# Altium PCB EFI.PcbDoc (part 2 of 3)
Units mm, origin at the board's own origin, x right, y up, seen from the top; angles counter-clockwise.
Board outline 100.1 x 100.83 mm, 2 copper layers (Top Layer, Bottom Layer), stack 1.57 mm thick; 101 components, 85 nets, 326 pads, 97 vias.
Unrouted connection lines stored in the file: 58.
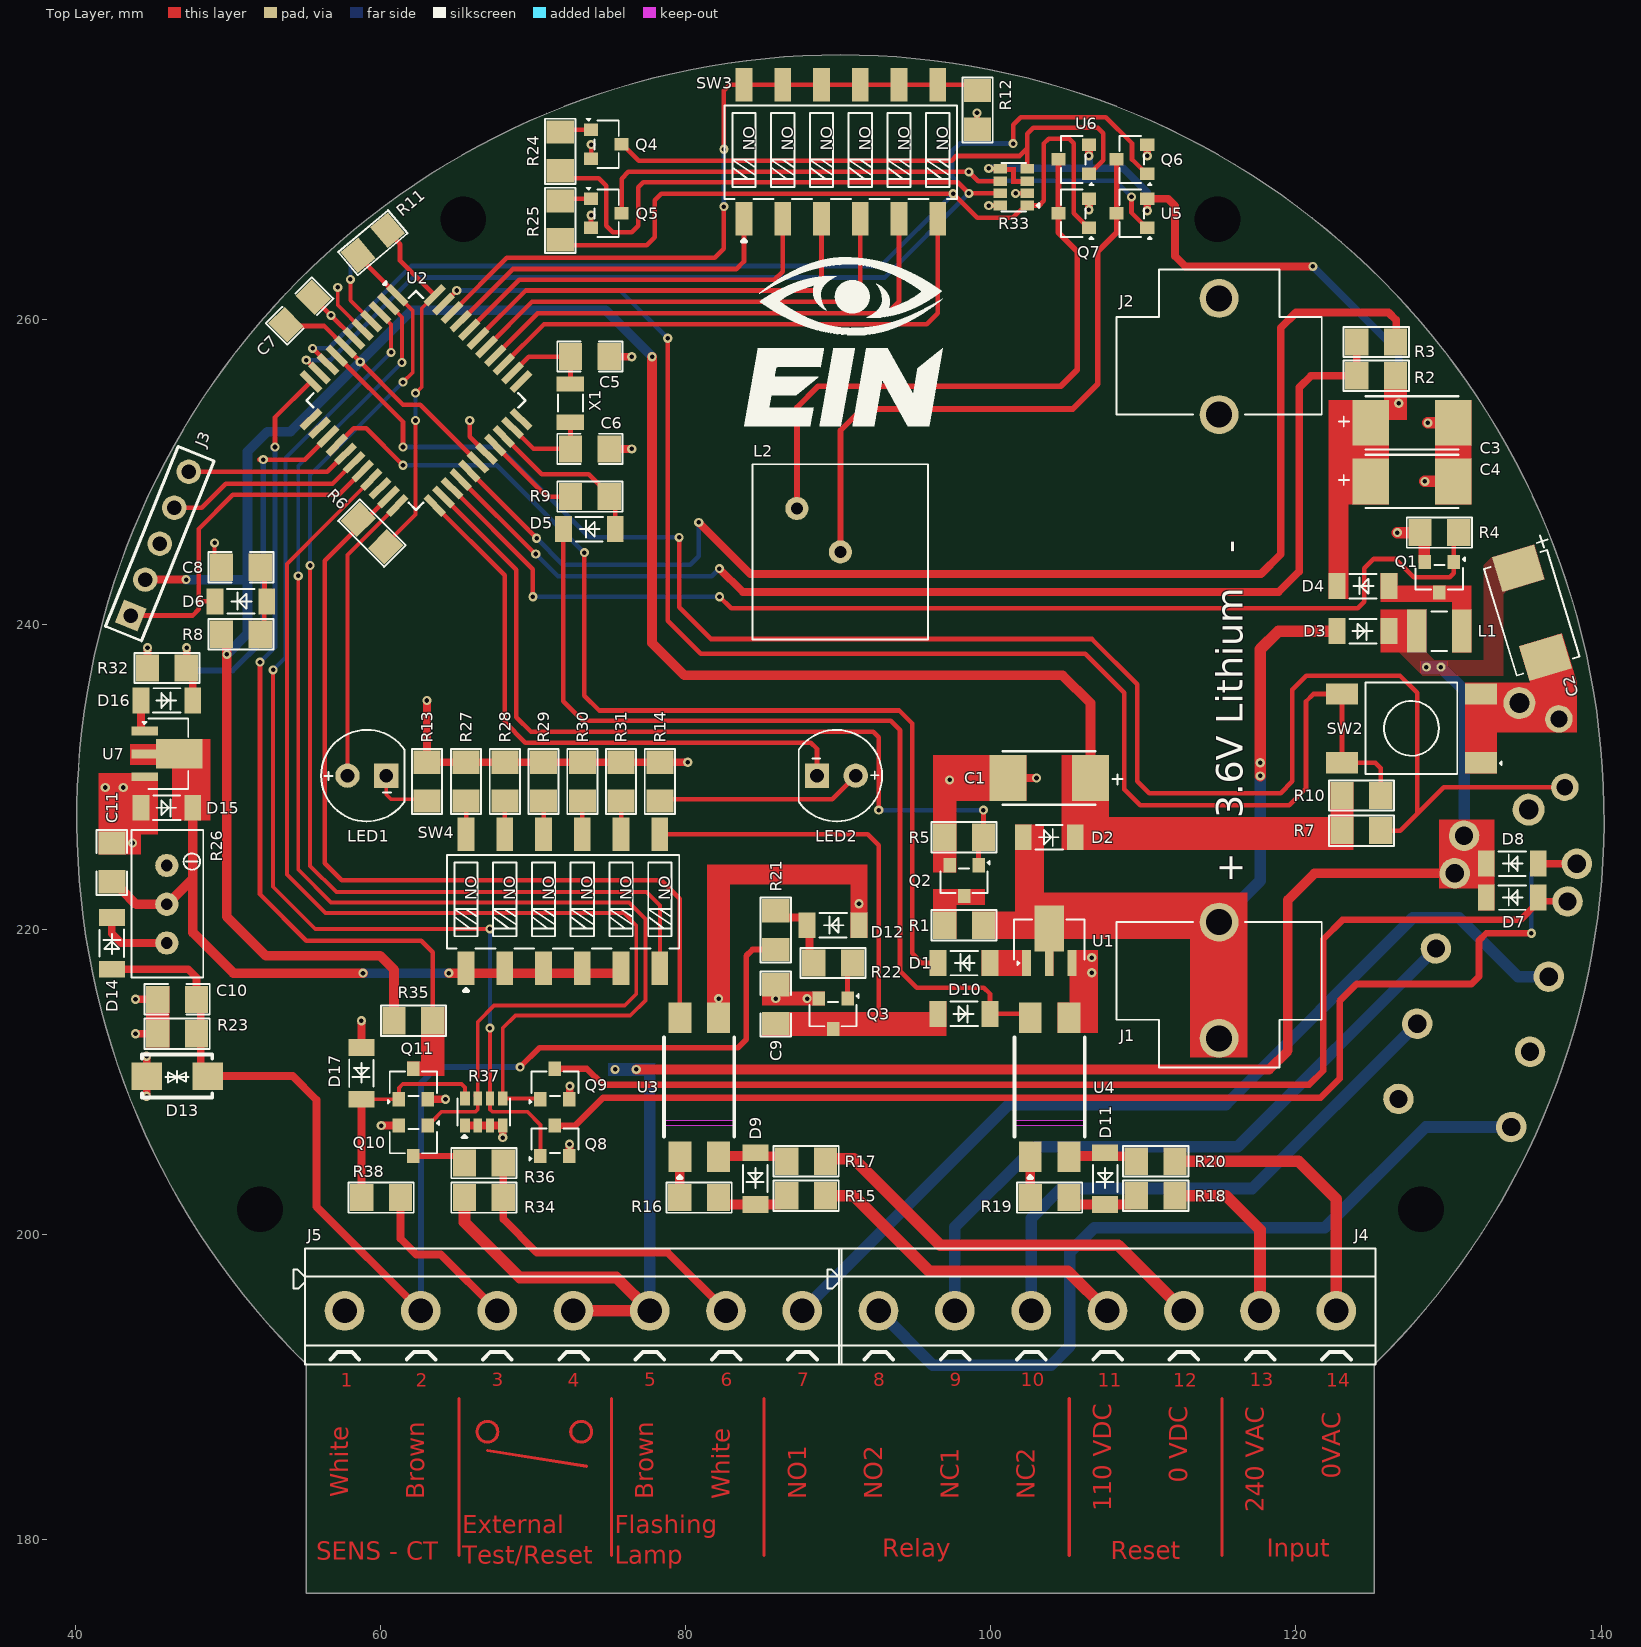
[diagram p0: Top Layer view]

## Part data (continued)
SW3 SW4: "6 digits 24V Black 25mA 3000 Times SMD DIP Switches ROHS", LCSC Part Number=C5439765, Manufacturer="SM Switch", Package=SMD, ComponentLink1Description=LCSC, ComponentLink1URL=https://www.lcsc.com/product-detail/DIP-Switches_SM-Switch-SMXS-06K-TP_C5439765.html, Item Type="DIP SWITCH", Manufacturer Part Number=SMXS-06K-TP
TP1: "Wire Connecting Pad", Item Type="Test Point", Manufacturer Part Number="2 Test Pad"
TP2: "Test Point ON", Item Type="TEST POINT"
U1 U7: "Supervisory Circuits", LCSC Part Number=-, Manufacturer=Torex, Package=SOT-89, ComponentLink1Description=Torex, Item Type=IC
  U1: ComponentLink1URL=https://direct.torexsemi.com/en-us/product/xc61c/xc61cc2502pr-g, Manufacturer Part Number=XC61CC2502PR-G
  U7: ComponentLink1URL=https://direct.torexsemi.com/en-us/product/xc61c/xc61cc3002pr-g, Manufacturer Part Number=XC61CC3002PR-G
U2: "IC MCU 8BIT 14KB FLASH 44TQFP", LCSC Part Number=C31511, Manufacturer=Microchip, Access Time=20us, ComponentLink1Description=https://datasheet.ciiva.com/6149/41291f-6149840.pdf?src-supplier=Farnell, ComponentLink1URL=https://datasheet.ciiva.com/6149/41291f-6149840.pdf?src-supplier=Farnell, ComponentLink2Description=https://datasheet.ciiva.com/29119/160450-da-01-en-pic-pic16f887-i-pt-29119396.pdf?src-supplier=Conrad, ComponentLink2URL=https://datasheet.ciiva.com/29119/160450-da-01-en-pic-pic16f887-i-pt-29119396.pdf?src-supplier=Conrad, ComponentLink3Description=https://datasheet.ciiva.com/1489/41291g-1489550.pdf?src-supplier=Digikey, ComponentLink3URL=https://datasheet.ciiva.com/1489/41291g-1489550.pdf?src-supplier=Digikey, ComponentLink4Description=https://datasheet.ciiva.com/3203/41291f-3203503.pdf?src-supplier=Avnet, ComponentLink4URL=https://datasheet.ciiva.com/3203/41291f-3203503.pdf?src-supplier=Avnet, ComponentLink5Description=https://datasheet.ciiva.com/16211/filehandler-aspxddocname-en027084-16211484.pdf?src-supplier=Future+Electronics, ComponentLink5URL=https://datasheet.ciiva.com/16211/filehandler-aspxddocname-en027084-16211484.pdf?src-supplier=Future+Electronics, ComponentLink6Description=https://datasheet.ciiva.com/7892/41291f-7892232.pdf?src-supplier=Element14, ComponentLink6URL=https://datasheet.ciiva.com/7892/41291f-7892232.pdf?src-supplier=Element14, ComponentLink7Description=https://datasheet.ciiva.com/7892/1681365-7892233.pdf?src-supplier=Element14, ComponentLink7URL=https://datasheet.ciiva.com/7892/1681365-7892233.pdf?src-supplier=Element14, Item Type=IC, Lead Free=5697LeadFree, Manufacturer Part Number=PIC16F887-I/PT, Pricing="1=2.91 (USD)", RoHS=Yes, Stock=46, Supplier="Arrow Electronics"
U3 U4: "OPTOISOLATOR 5.3KV TRANS 4SMD", LCSC Part Number=C5156027, Manufacturer=Vishay, Item Type=IC, Manufacturer Part Number=SFH6156-2, Pricing="1=0.56, 10=0.37, 50=0.37, 100=0.253, 1000=0.218, 10000=0.217 (USD)", RoHS=No, Stock=11480, Supplier=Mouser
U5 U6: "MOSFET P-CH 20V 4.2A SOT23-3", LCSC Part Number=C85097, Manufacturer="Diodes Zetex", ComponentLink1Description=https://datasheet.ciiva.com/13059/ds31737-52560-13059868.pdf?src-supplier=Mouser, ComponentLink1URL=https://datasheet.ciiva.com/13059/ds31737-52560-13059868.pdf?src-supplier=Mouser, ComponentLink2Description=https://datasheet.ciiva.com/11176/ds31737-11176455.pdf?src-supplier=Avnet, ComponentLink2URL=https://datasheet.ciiva.com/11176/ds31737-11176455.pdf?src-supplier=Avnet, Item Type=MOSFETs, Manufacturer Part Number=DMP2305U-7, Pricing="3000=0.0412, 9000=0.0402, 15000=0.0398, 45000=0.0388, 75000=0.038 (USD)", RoHS=Yes, Stock=207000, Supplier="Future Electronics"
X1: "32.768kHz Surface Mount Crystal 12.5pF ±20ppm SMD3215-2P Crystals ROHS", LCSC Part Number=C32346, Manufacturer=Epson, ComponentLink1Description=https://datasheet.octopart.com/Q13FC13500004-Epson-datasheet-62043850.pdf?src-supplier=Farnell, ComponentLink1URL=https://datasheet.octopart.com/Q13FC13500004-Epson-datasheet-62043850.pdf?src-supplier=Farnell, ComponentLink2Description=https://datasheet.octopart.com/Q13FC13500004-Epson-datasheet-32025749.pdf?src-supplier=Newark, ComponentLink2URL=https://datasheet.octopart.com/Q13FC13500004-Epson-datasheet-32025749.pdf?src-supplier=Newark, Item Type=Crystals, Manufacturer Part Number=Q13FC13500004, Reach SVHC Compliant=4187SVHC, RoHS=Yes, Stock=52665, Supplier=Farnell

## Free pads (board coordinates)
  round 0 hole 3 unplated: MH(52.095,201.651) MH(65.43,266.548) MH(114.859,266.548) MH(128.194,201.651)

## Via types
v1: diameter 0.6, hole 0.3, Top Layer to Bottom Layer, 97 vias

## Nets (pads, with @x,y where several pads share a name; then routed paths per layer and width w, separated by ;. In a path a pad name is that pad's centre, name@x,y a point inside that pad or via, vN(x,y) a via of type N, cw(c..) or ccw(c..) an arc to the next point about the centre after c; other vN are vias at no path point)
AUTO_RST: R11.2 SW4.6 U2.1 | length 72.6
  Top Layer w0.254: v1(55.386,243.847) 55.386,224.16 57.109,222.437 77.432,222.437 78.309,221.56 SW4.6@78.309,217.438 ; U2.1@61.093,261.557 62.117,260.533 62.117,256.512 v1(61.476,255.87)
  Top Layer w0.305: R11.2@58.864,264.458 58.864,263.786 U2.1@61.093,261.557
  Bottom Layer w0.254: v1(55.386,243.847) 55.386,249.78 v1(61.476,255.87)
AUTO_RST_CT: C9.2 D10.2 Q3.3 SW4.7 | length 27.6
  Top Layer w0.305: SW4.7@78.309,226.238 91.927,226.238 92.655,225.51 92.655,214.438 92.013,213.796 91.056,213.796
BATT_CNT_RST: R10.1 SW2.2 U2.43 | length 103.1
  Top Layer w0.305: U2.43@64.122,260.991 v1(65.001,261.87) ; v1(78.829,258.737) 78.829,240.225 80.993,238.061 106.197,238.061 108.75,235.508 108.75,229.17 109.79,228.13 119.556,228.13 120.66,229.234 120.66,234.935 121.147,235.422 SW2.2@123.022,235.422 SW2.2@123.022,230.922 125.212,230.922 125.562,230.571 R10.1@125.562,228.778
  Bottom Layer w0.305: v1(65.001,261.87) 75.696,261.87 v1(78.829,258.737)
BATT_LED: LED1.2 U2.22 | length 19.1
  Top Layer w0.254: LED1.2@57.836,230.073 57.836,244.523 U2.22@61.093,247.78
BATT_LOAD: Q2.1 R5.2 U2.24 | length 56.1
  Top Layer w0.305: U2.24@64.122,248.345 68.907,243.561 68.907,233.904 69.864,232.947 92.292,232.947 92.655,232.584 v1(92.655,227.816) ; Q2.1@99.197,224.199 99.197,225.715 R5.2@99.517,226.035 v1(99.517,227.816)
  Bottom Layer w0.305: v1(92.655,227.816) v1(99.517,227.816)
BATT_LOW_SNS: D1.1 U2.15 | length 68.7
  Top Layer w0.305: U2.15@57.133,251.74 58.235,252.841 59.055,252.841 v1(61.476,250.42) ; v1(73.36,244.692) 73.36,235.324 74.341,234.343 93.992,234.343 94.843,233.492 94.843,218.424 95.477,217.79 D1.1@96.547,217.79
  Bottom Layer w0.305: v1(61.476,250.42) 67.632,250.42 v1(73.36,244.692)
BLINK_LAMP: Q10.1 R37.7 U2.19 | length 77.4
  Top Layer w0.254: U2.19@59.396,249.477 56.764,246.845 53.861,243.942 53.861,223.589 56.386,221.064 75.96,221.064 76.763,220.262 76.763,215.751 76.01,214.998 67.437,214.998 66.372,213.934 66.372,209.23 66.26,209.117 R37.7@66.238,209.117 ; Q10.1@63.104,207.137 63.104,207.187 63.387,207.47 63.437,207.47 64.009,208.042 66.223,208.042 66.372,208.191 R37.7@66.372,208.907
BLINK_LAMP_O: J5.2 R34.1 R36.1 | length 20.9
  Top Layer w0.508: R34.1@68.042,202.289 R36.1@68.042,204.677 ; R34.1@68.042,202.416 68.042,201.021 70.252,198.811 78.824,198.811 J5.2@82.645,194.991
BOOST_FB1: R2.1 R3.2 U2.26 | length 77.3
  Top Layer w0.305: U2.26@65.254,249.477 65.273,249.477 70.151,244.599 v1(70.17,244.599)
  Top Layer w0.508: v1(82.207,243.644) 83.736,242.116 118.875,242.116 120.218,243.459 120.218,255.511 120.991,256.284 R2.1@123.993,256.284 R3.2@123.993,258.496
  Bottom Layer w0.305: v1(70.17,244.599) 71.633,243.136 81.699,243.136 v1(82.207,243.644)
BOOST_FB2: R3.1 U2.27 | length 84.5
  Top Layer w0.305: U2.27@65.819,250.043 v1(70.231,245.631)
  Top Layer w0.508: v1(80.861,246.669) 84.242,243.288 117.71,243.288 118.999,244.577 118.999,259.424 120.002,260.426 126.07,260.426 126.566,259.93 R3.1@126.566,258.529
  Bottom Layer w0.305: v1(70.231,245.631) 71.958,243.903 80.303,243.903 80.861,244.461 v1(80.861,246.669)
BOOST_PWR: Q1.1 R4.2 U2.25 | length 76
  Top Layer w0.305: U2.25@64.688,248.911 69.99,243.609 v1(69.99,241.795) ; v1(82.218,241.795) 82.98,241.033 124.04,241.033 124.483,241.476 124.483,243.665 125.093,244.275 126.517,244.275 127.719,243.073 130.084,243.073 130.347,243.336 130.347,245.679 R4.2@130.667,245.999
  Bottom Layer w0.305: v1(69.99,241.795) v1(82.218,241.795)
CONFIG_SW_COM: R12.2 SW3.7 SW3.8 SW3.9 SW3.10 SW3.11 SW3.12 U2.42 | length 46.9
  Top Layer w0.305: U2.42@64.688,260.426 68.27,264.008 81.909,264.008 82.504,264.603 v1(82.504,267.373) ; v1(82.504,271.132) 82.504,274.976 82.89,275.361 SW3.12@83.82,275.361 SW3.11@86.36,275.361 SW3.10@88.9,275.361 SW3.9@91.44,275.361 SW3.8@93.98,275.361 SW3.7@96.52,275.361 98.755,275.361 R12.2@99.136,274.98
  Bottom Layer w0.305: v1(82.504,267.373) v1(82.504,271.132)
CT_IN: C10.2 D13.2 D14.2 J5.6 R21.2 R23.2 | length 82
  Top Layer w0.381: v1(69.149,210.971) 70.42,212.242 83.439,212.242 83.972,212.776 83.972,218.262 84.389,218.679 R21.2@85.903,218.679
  Top Layer w0.508: D14.2@42.39,217.381 47.394,217.381 47.944,216.831 C10.2@47.944,215.413 48.226,215.131 48.226,213.153 48.226,210.832 D13.2@48.674,210.384 54.243,210.384 55.8,208.827 55.8,201.835 J5.6@62.645,194.991
  Bottom Layer w0.381: J5.6@62.645,194.991 62.645,209.92 63.696,210.971 v1(69.149,210.971)
CT_RB4: D16.1 R32.1 U2.14 | length 27.6
  Top Layer w0.305: v1@52.059,250.789 52.064,250.785 55.047,250.785 U2.14@56.567,252.305
  Top Layer w0.508: v1(47.295,238.452) 47.295,237.16 R32.1@47.269,237.134 47.699,236.704 D16.1@47.699,235.001
  Bottom Layer w0.381: v1(47.295,238.452) 47.295,237.527 47.86,236.961 50.307,236.961 52.313,238.968 v1(52.313,250.789)
EXT_RST_I: Q11.3 R35.1 U2.11 | length 52.4
  Top Layer w0.305: v1(52.103,237.515) 52.103,222.294 55.145,219.252 62.666,219.252 63.424,218.494 R35.1@63.424,214.008 ; v1(53.086,251.613) 53.086,253.55 U2.11@55.436,255.9
  Bottom Layer w0.305: v1(52.103,237.515) 53.086,238.498 53.086,251.358 52.911,251.533 v1@52.911,251.613
EXT_RST_IN: D17.1 Q11.1 R37.8 R38.1 | length 14.9
  Top Layer w0.254: D17.1@58.75,208.864 Q11.1@61.204,208.864 61.204,209.61 61.458,209.864 65.306,209.864 65.532,209.637 R37.8@65.532,208.907
  Top Layer w0.508: D17.1@58.75,208.864 58.75,202.442 R38.1@58.777,202.416
GND: C1.2 C2.2 C3.2 C4.2 C5.1 C6.1 C7.1 C8.1 C9.1 C10.1 C11.1 D12.2 D13.1 D15.2 D17.2 J2.1 J3.3 J5.7 Q1.2 Q2.2 Q3.2 Q4.2 Q5.2 Q6.2 Q7.2 Q8.2 Q9.2 Q10.2 Q11.2 R4.1 R5.1 R12.1 R13.1 R14.1 R23.1 R26.1 R27.2 R28.2 R29.2 R30.2 R31.2 R32.2 R33.2 R33.8 R37.1 R37.2 R37.3 R37.4 SW1.1 SW1.SH1 SW1.SH2 SW2.1 TP2.1 U1.3 U2.6 U2.29 U3.3 U4.3 U7.3 | length 75.3
  Top Layer w0.254: v1(49.124,245.325) 49.124,244.192 C8.1@49.581,243.735
  Top Layer w0.305: C7.1@55.723,261.603 55.723,261.27 v1(56.753,260.24) U2.6@58.265,258.729 ; v1(65.849,253.35) 65.849,252.276 U2.29@66.951,251.174 ; v1(73.8,266.802) 73.8,265.982 Q5.2@73.803,265.979 ; Q4.2@73.803,270.5 v1(73.803,271.436) ; v1(99.862,267.439) R33.8@100.623,267.439 ; v1(101.627,268.239) R33.2@102.393,268.239
  Top Layer w0.381: v1(99.095,273.507) 99.095,272.482 R12.1@99.136,272.44
  Top Layer w0.508: C11.1@42.39,225.657 v1(43.747,225.657) ; v1(43.942,213.153) R23.1@45.404,213.153 ; v1(43.942,215.413) C10.1@45.404,215.413 ; 44.297,226.721 D15.2@44.297,227.969 ; v1(44.674,209.059) D13.1@44.674,210.384 v1(44.674,211.679) ; R32.2@44.729,237.134 v1(44.729,238.452) ; D17.2@58.75,212.264 v1(58.75,214.008) ; v1(60.047,207.137) Q10.2@61.204,207.137 ; v1(63.043,235.001) R13.1@63.043,230.95 R27.2@65.609,230.95 R28.2@68.149,230.95 R29.2@70.689,230.95 R30.2@73.228,230.95 R31.2@75.769,230.95 R14.1@78.309,230.95 v1(80.137,230.95) ; Q11.2@63.104,208.864 v1(64.261,208.864) ; R37.1@65.532,207.137 R37.2@66.372,207.137 R37.3@67.172,207.137 R37.4@68.012,207.137 v1(68.012,206.35) ; Q8.2@72.385,205.137 v1(72.385,205.918) ; Q9.2@72.385,208.864 72.398,208.877 72.398,209.711 v1(72.412,209.724) ; C6.1@74.988,251.493 74.996,251.485 v1(76.467,251.485) ; C5.1@74.988,257.54 74.996,257.532 v1(76.467,257.532) ; U3.3@82.159,214.463 v1(82.159,215.463) ; v1(85.903,215.463) C9.1@85.903,216.368 ; v1(87.962,215.463) Q3.2@88.712,215.463 ; D12.2@91.362,220.269 v1(91.362,221.677) ; Q2.2@97.297,224.199 v1(97.297,229.791) ; C1.2@101.131,229.921 v1(102.997,229.921) ; v1(106.428,267.158) Q7.2@106.428,267.879 ; v1(110.254,270.689) Q6.2@110.254,271.409
  Top Layer w0.762: v1(126.646,245.999) R4.1@128.127,245.999 128.418,245.708 128.418,244.119 Q1.2@128.447,244.09 ; v1(128.447,249.361) C4.2@130.303,249.361 ; v1(128.646,253.196) C3.2@130.303,253.196
  other v1: 106.617,217.157 106.617,218.148 41.961,229.298 43.142,229.298
HDRV_1: Q4.3 R33.4 U6.1 | length 38.1
  Top Layer w0.305: Q4.3@75.803,271.45 75.853,271.45 76.921,270.382 97.436,270.382 97.743,270.689 101.884,270.689 102.393,271.199 ; R33.4@102.393,269.839 102.393,271.199 ; U6.1@106.428,269.509 106.478,269.509 107.379,270.41 107.379,272.182 107.024,272.538 102.778,272.538 102.393,272.153 102.393,271.199
HDRV_2: Q5.3 R33.6 U5.1 | length 41.3
  Top Layer w0.305: Q5.3@75.803,266.929 75.803,269.201 76.245,269.643 v1(98.562,269.643) 99.166,269.039 R33.6@100.623,269.039 ; v1(109.22,268.008) 109.22,266.962 110.204,265.979 U5.1@110.254,265.979
  Bottom Layer w0.305: v1(98.562,269.643) 99.13,269.075 108.153,269.075 v1(109.22,268.008)
ICSP_PGC: J3.5 U2.16 | length 10.8
  Top Layer w0.305: J3.5@47.434,249.987 56.512,249.987 U2.16@57.699,251.174
ICSP_PGD: J3.4 U2.17 | length 13
  Top Layer w0.305: J3.4@46.483,247.631 48.292,247.631 49.858,249.197 56.853,249.197 U2.17@58.265,250.608
IN_RSH_CRNT: SW3.4 U2.38 | length 30.7
  Top Layer w0.305: U2.38@66.951,258.163 69.927,261.14 90.754,261.14 91.44,261.825 SW3.4@91.44,266.561
LDRV_1: Q7.1 R25.2 R33.1 U2.9 | length 95.4
  Top Layer w0.305: v1(55.554,258.08) 56.567,257.066 U2.9@56.567,257.032 ; R25.2@71.78,265.201 72.149,264.833 77.449,264.833 77.985,265.368 77.985,267.791 78.402,268.208 v1(97.531,268.208) 99.109,266.63 101.449,266.63 102.258,267.439 103.17,267.439 103.476,267.745 103.476,271.504 103.79,271.819 105.13,271.819 105.428,271.521 105.428,266.929 106.378,265.979 Q7.1@106.428,265.979
  Bottom Layer w0.305: v1(55.554,258.08) 56.614,258.08 62.01,263.476 92.799,263.476 v1(97.531,268.208)